# Altium PCB ZYNQ_BOARD.PcbDoc (part 4 of 9)
Units mm, origin at the board's own origin, x right, y up, seen from the top; angles counter-clockwise.
Board outline 120 x 66 mm, 10 copper layers (Top Layer, Internal Plane 1 (GND), Middle Layer 1, Middle Layer 2, Internal Plane 2 (+1.0V), Middle Layer 3, Middle Layer 4, Middle Layer 5 (PWR), Internal Plane 3 (GND), Bottom Layer), stack 0.982 mm thick; 333 components, 331 nets, 1511 pads, 1077 vias.
Unrouted connection lines stored in the file: 30.
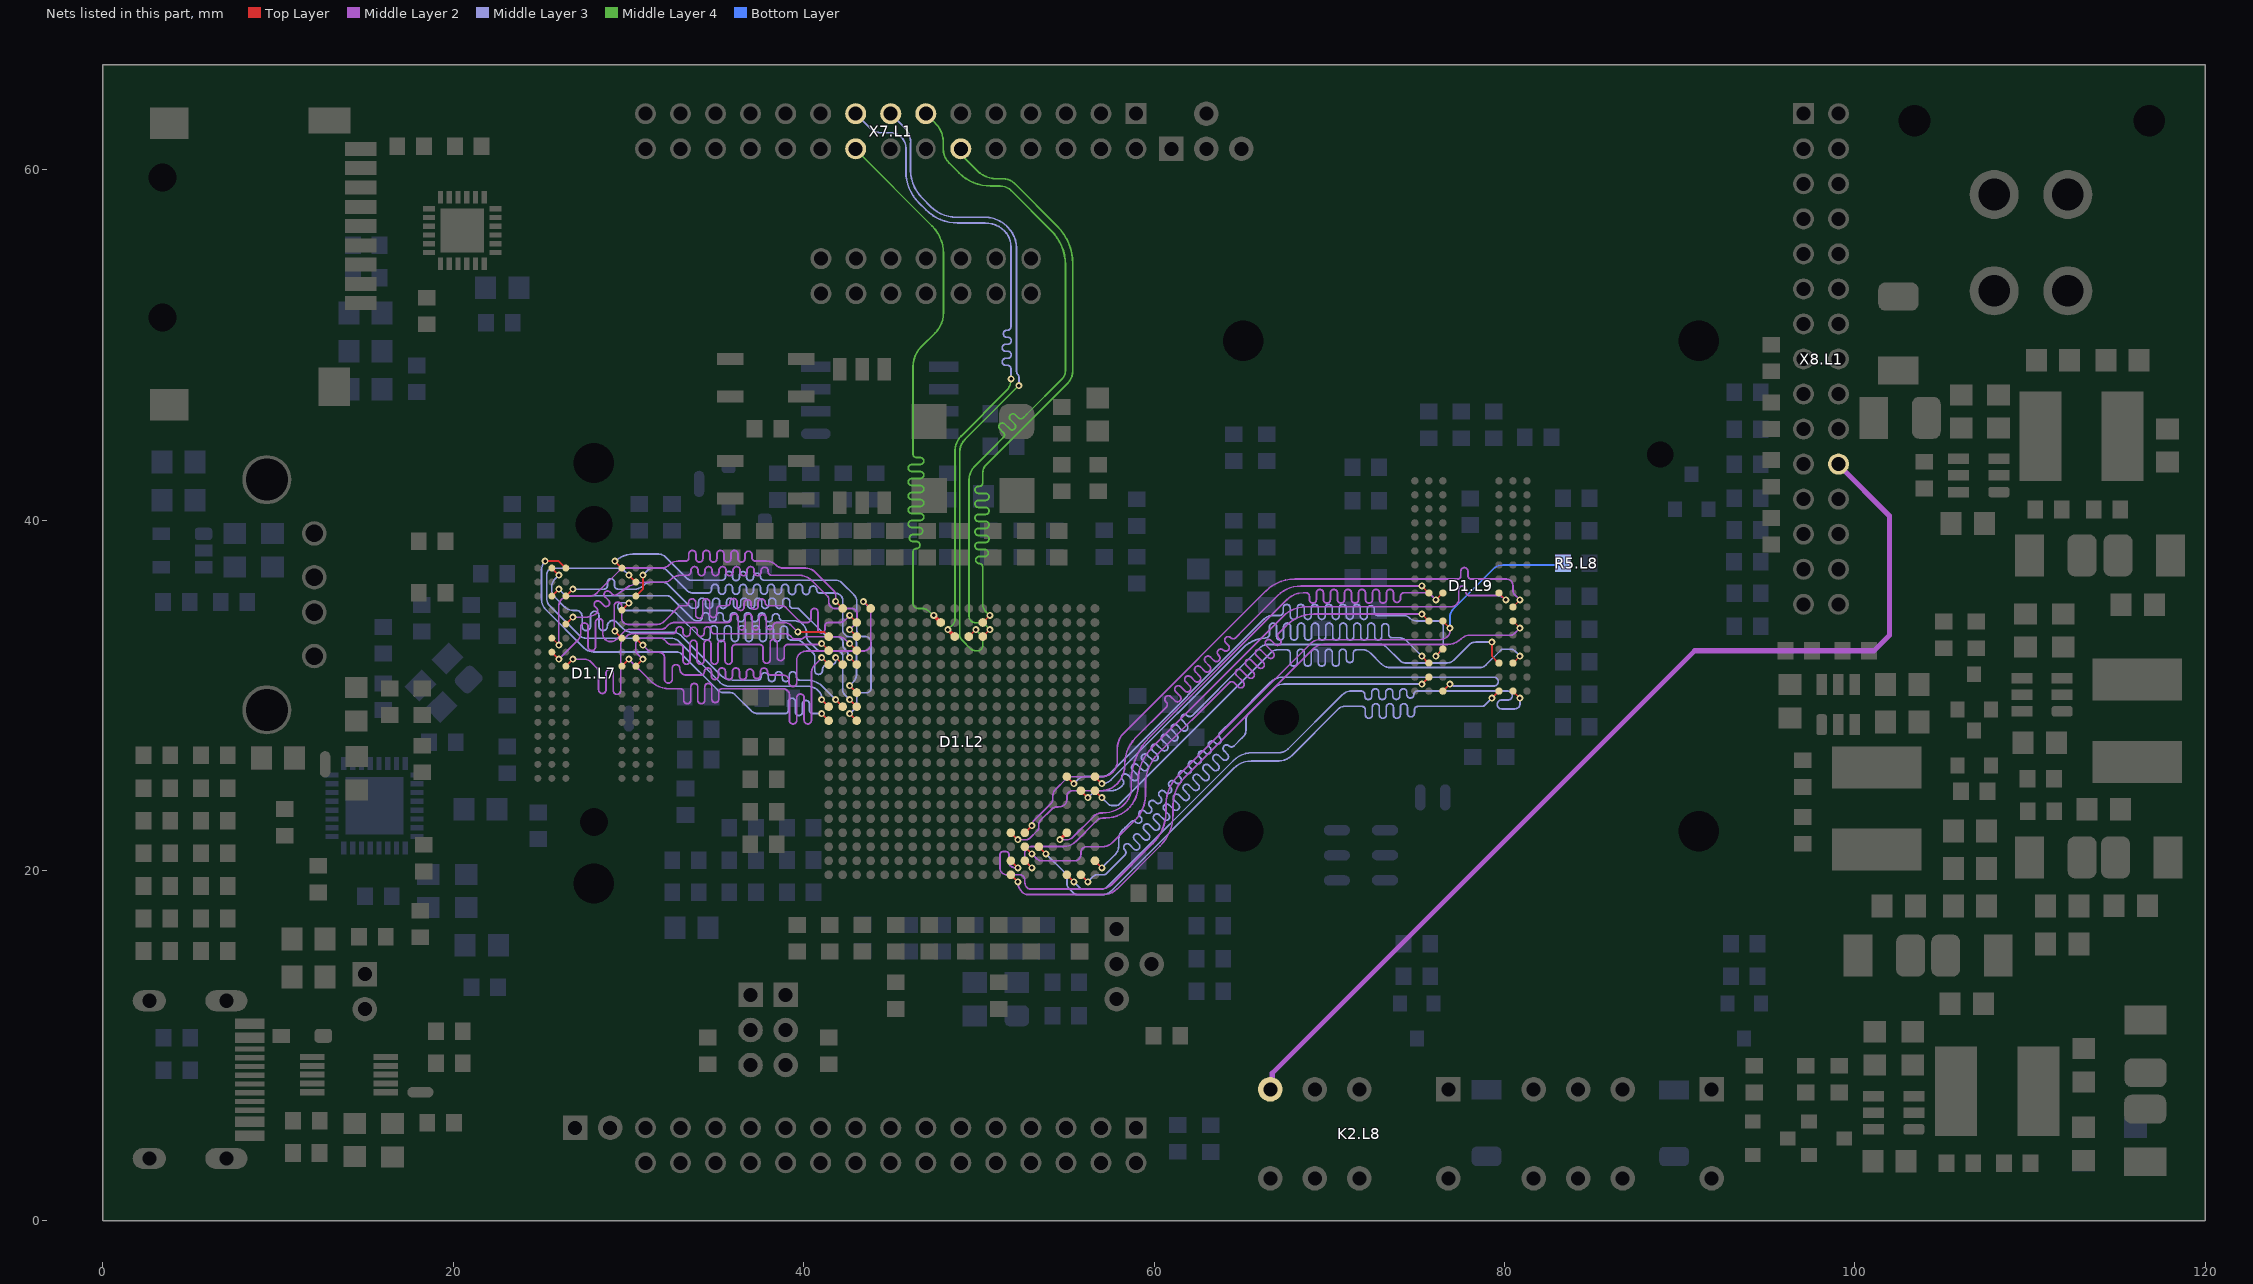
[diagram p12: the nets of this part, all layers, seen from the top]

## Via types
v1: diameter 0.4, hole 0.2, Top Layer to Bottom Layer, 1059 vias
v2: diameter 0.9, hole 0.6, Top Layer to Bottom Layer, 18 vias

## Nets (pads, with @x,y where several pads share a name; then routed paths per layer and width w, separated by ;. In a path a pad name is that pad's centre, name@x,y a point inside that pad or via, vN(x,y) a via of type N, cw(c..) or ccw(c..) an arc to the next point about the centre after c; other vN are vias at no path point) (continued)
DQ1: D1.L2.W14 D1.L9.F7 R5.L8.2 | length 46.1
  Top Layer w0.1: D1.L2.W14@51.82,20.56 v1(52.22,20.16) ; D1.L9.F7@76.48,34.245 v1(76.88,33.845)
  Middle Layer 2 w0.1: 51.201,20.145 ccw(c51.584,20.145) 51.581,19.762 ; 51.201,20.146 51.201,20.914 cw(c51.37,20.914) 51.37,21.083 51.546,21.083 cw(c51.546,20.914) 51.715,20.914 51.715,20.48 ccw(c52.001,20.48) 51.799,20.278 51.8,20.277 ccw(c52.085,20.562) 52.085,20.159 v1@52.219,20.159 ; 51.582,19.762 52.336,19.762 cw(c52.336,19.494) 52.526,19.684 cw(c52.298,19.456) 52.62,19.456 52.62,19.319 ccw(c53.043,19.319) 52.744,19.02 ccw(c52.913,19.189) 52.913,18.95 56.976,18.95 ccw(c56.976,19.804) 57.58,19.2 59.93,21.55 ccw(c58.134,23.346) 60.674,23.346 60.674,23.78 cw(c62.912,23.78) 61.329,25.362 68.932,32.965 cw(c69.453,32.443) 69.453,33.181 76.261,33.181 ccw(c76.261,33.929) 76.79,33.4 ccw(c76.573,33.617) 76.88,33.617 v1(76.88,33.845)
  Bottom Layer w0.1: v1(76.88,33.845) 76.88,34.465 cw(c77.539,34.465) 77.073,34.931 79.368,37.226 cw(c79.892,36.702) 79.892,37.443 83.101,37.443 ccw(c83.101,37.774) R5.L8.2@83.335,37.54
DQ1_M0_F: K2.L8.5 X8.L1.22 | length 57.5
  Middle Layer 2 w0.3: K2.L8.5@66.63,7.51 66.738,7.618 66.738,8.428 90.854,32.544 101.084,32.544 101.972,33.432 101.972,40.248 X8.L1.22@99.06,43.161
DQ2: D1.L2.Y14 D1.L9.F2 | length 37.6
  Top Layer w0.1: D1.L2.Y14@51.82,19.76 v1(52.22,19.36) ; D1.L9.F2@80.48,34.245 v1(80.88,33.845)
  Middle Layer 2 w0.1: v1(52.22,19.36) ccw(c53.041,19.36) 52.46,18.78 52.49,18.75 ccw(c52.78,19.04) 52.78,18.63 57.113,18.63 ccw(c57.113,19.723) 57.885,18.95 60.336,21.401 ccw(c58.54,23.197) 61.08,23.197 61.08,23.738 cw(c63.29,23.738) 61.727,25.3 69.083,32.656 cw(c69.687,32.054) 69.687,32.907 76.753,32.907 ccw(c76.753,33.982) 77.513,33.222 cw(c78.036,32.699) 78.036,33.438 80.368,33.438 ccw(c80.368,33.691) 80.547,33.512 v1(80.88,33.845)
DQ3: D1.L2.V15 D1.L9.F8 | length 37.6
  Top Layer w0.1: D1.L2.V15@52.62,21.36 v1(53.02,20.96) ; v1(75.28,34.645) D1.L9.F8@75.68,34.245
  Middle Layer 2 w0.1: v1(53.02,20.96) 53.335,20.645 ccw(c53.55,20.86) 53.55,20.556 55.459,20.556 ccw(c55.459,20.919) 55.715,20.662 ccw(c55.464,20.914) 55.819,20.914 55.819,21.05 cw(c56.113,21.05) 55.905,21.257 55.926,21.278 cw(c56.127,21.078) 56.127,21.361 57.025,21.361 ccw(c57.025,22.238) 57.645,21.618 58.908,22.882 ccw(c57.483,24.309) 59.5,24.309 ; 59.5,24.31 59.5,24.888 cw(c62.04,24.888) 60.244,26.684 63.962,30.402 64.281,30.721 cw(c64.422,30.579) 64.563,30.721 64.796,30.488 ccw(c64.938,30.629) 65.079,30.488 ccw(c64.938,30.629) 65.079,30.77 64.699,31.151 cw(c64.84,31.292) 64.699,31.434 cw(c64.84,31.292) 64.982,31.434 65.382,31.033 ccw(c65.523,31.175) 65.665,31.033 ccw(c65.523,31.175) 65.665,31.316 65.264,31.716 cw(c65.406,31.858) 65.264,31.999 cw(c65.406,31.858) 65.547,31.999 65.947,31.599 ccw(c66.089,31.741) 66.23,31.599 ccw(c66.089,31.741) 66.23,31.882 65.83,32.282 cw(c65.972,32.424) 65.83,32.565 cw(c65.972,32.424) 66.113,32.565 66.513,32.165 ccw(c66.655,32.306) 66.796,32.165 ccw(c66.655,32.306) 66.796,32.448 66.396,32.848 cw(c66.537,32.989) 66.396,33.131 cw(c66.537,32.989) 66.679,33.131 66.898,32.911 ccw(c67.04,33.052) 67.181,32.911 ccw(c67.04,33.052) 67.181,33.194 67.109,33.266 cw(c67.25,33.408) 67.109,33.549 67.56,34 67.915,34.288 cw(c69.117,32.443) 67.958,34.315 cw(c69.117,32.443) 69.117,34.645 v1(75.28,34.645)
DQ4: D1.L2.W15 D1.L9.H3 | length 37.6
  Top Layer w0.1: D1.L2.W15@52.62,20.56 v1(53.02,20.16) ; D1.L9.H3@79.68,35.845 v1(80.08,35.445)
  Middle Layer 2 w0.1: v1(53.02,20.16) 52.744,20.436 cw(c53.061,20.753) 52.613,20.753 52.613,20.984 cw(c52.98,20.984) 52.72,21.243 cw(c53.044,20.92) 53.044,21.377 54.846,21.377 ccw(c54.846,22.325) 55.516,21.655 56.707,22.846 cw(c57.08,22.473) 57.08,23 57.228,23 ; 57.229,23 ccw(c57.229,24.86) 59.088,24.86 59.088,25.1 cw(c61.839,25.1) 59.894,27.045 67.369,34.521 cw(c68.649,33.246) 68.649,35.053 76.92,35.053 ccw(c76.92,35.53) 77.257,35.192 77.265,35.2 ccw(c76.963,35.502) 77.39,35.502 77.39,36.042 cw(c77.59,36.042) 77.59,36.242 cw(c77.59,36.042) 77.789,36.042 77.789,35.919 ccw(c78.031,35.919) 77.86,35.748 ccw(c77.975,35.863) 77.975,35.7 79.464,35.7 cw(c79.464,34.829) v1(80.08,35.445)
DQ5: D1.L2.U14 D1.L9.H8 | length 37.6
  Top Layer w0.1: D1.L2.U14@51.82,22.16 v1(52.22,21.76) ; v1(75.28,36.245) D1.L9.H8@75.68,35.845
  Middle Layer 2 w0.1: v1(52.22,21.76) 52.671,21.76 ccw(c52.671,22.115) 52.922,21.864 53.344,22.286 ccw(c53.176,22.453) 53.413,22.453 53.413,22.618 cw(c53.764,22.618) 53.516,22.866 54.181,23.531 cw(c54.42,23.293) 54.42,23.63 54.531,23.63 ; 54.532,23.63 ccw(c54.532,24.166) 54.912,23.788 ccw(c54.642,24.056) 55.022,24.056 55.022,24.245 ; 55.022,24.246 cw(c55.332,24.246) 55.354,24.555 56.937,24.555 ; 56.937,24.555 ccw(c56.937,25.897) 57.885,24.947 ccw(c56.835,25.997) 58.32,25.997 ; 58.32,25.998 58.32,26.063 cw(c60.486,26.063) 58.954,27.594 60.658,29.298 60.693,29.333 ccw(c60.552,29.475) 60.693,29.616 60.669,29.64 cw(c60.811,29.782) 60.669,29.923 cw(c60.811,29.782) 60.952,29.923 61.187,29.688 ccw(c61.329,29.829) 61.47,29.688 ccw(c61.329,29.829) 61.47,29.971 61.235,30.206 cw(c61.377,30.347) 61.235,30.489 cw(c61.377,30.347) 61.518,30.489 61.753,30.254 ccw(c61.895,30.395) 62.036,30.254 ccw(c61.895,30.395) 62.036,30.536 61.801,30.772 cw(c61.942,30.913) 61.801,31.054 cw(c61.942,30.913) 62.084,31.054 62.319,30.819 ccw(c62.46,30.961) 62.602,30.819 ccw(c62.46,30.961) 62.602,31.102 62.367,31.337 cw(c62.508,31.479) 62.367,31.62 cw(c62.508,31.479) 62.649,31.62 62.884,31.385 ccw(c63.026,31.526) 63.167,31.385 ccw(c63.026,31.526) 63.167,31.668 62.932,31.903 cw(c63.074,32.044) 62.932,32.186 cw(c63.074,32.044) 63.215,32.186 63.414,31.987 ccw(c63.556,32.128) 63.697,31.987 ccw(c63.556,32.128) 63.697,32.269 63.663,32.303 cw(c63.805,32.445) 63.663,32.586 cw(c63.805,32.445) 63.946,32.586 ccw(c64.088,32.727) 64.229,32.586 ccw(c64.088,32.727) 64.229,32.869 64.087,33.01 cw(c64.229,33.152) 64.087,33.293 cw(c64.229,33.152) 64.37,33.293 ccw(c64.512,33.435) 64.653,33.293 65.101,33.741 67.06,35.7 cw(c68.376,34.384) 68.376,36.245 v1(75.28,36.245)
DQ6: D1.L2.U15 D1.L9.G2 | length 37.6
  Top Layer w0.1: D1.L2.U15@52.62,22.16 v1(53.02,22.56) ; D1.L9.G2@80.48,35.045 v1(80.88,35.445)
  Middle Layer 2 w0.1: v1(53.02,22.56) cw(c53.461,22.56) 53.149,22.872 54.131,23.854 ccw(c53.929,24.056) 54.215,24.056 54.215,24.259 cw(c54.726,24.259) 54.364,24.62 54.999,25.255 cw(c55.257,24.997) 55.257,25.362 57.024,25.362 ; 57.025,25.362 ccw(c57.025,26.217) 57.629,25.612 ccw(c56.973,26.267) 57.9,26.267 57.9,26.965 cw(c59.145,26.965) 58.265,27.845 58.714,28.294 66.376,35.956 cw(c68.02,34.311) 68.02,36.637 77.257,36.637 77.307,36.637 ccw(c77.307,36.837) 77.507,36.837 77.507,37.094 cw(c77.707,37.094) 77.907,37.094 77.907,36.837 ccw(c78.107,36.837) 78.107,36.637 78.99,36.637 80.132,36.637 cw(c80.132,36.305) 80.368,36.54 cw(c80.098,36.27) 80.479,36.27 80.479,35.984 ccw(c80.814,35.984) 80.577,35.748 v1(80.88,35.445)
DQ7: D1.L2.U18 D1.L9.H7 | length 37.6
  Top Layer w0.1: v1(76.08,35.445) D1.L9.H7@76.48,35.845
  Top Layer w0.2: v1(54.62,21.76) D1.L2.U18@55.02,22.16
  Middle Layer 2 w0.1: v1(54.62,21.76) 55.022,21.76 ccw(c55.022,22.235) 55.358,21.899 56.572,23.113 cw(c57,22.684) 57,23.29 57.065,23.29 ; 57.066,23.29 ccw(c57.066,25.075) 58.329,23.814 ccw(c57.418,24.716) 58.7,24.716 58.7,25.124 ; 58.7,25.125 cw(c62.194,25.125) 59.724,27.596 67.608,35.48 cw(c68.528,34.559) 68.212,35.822 cw(c68.528,34.559) 68.262,35.833 68.528,35.861 68.662,35.861 cw(c68.662,35.661) 68.862,35.661 68.862,35.467 ccw(c69.062,35.467) 69.262,35.467 69.262,35.845 cw(c69.462,35.845) 69.662,35.845 69.662,35.467 ccw(c69.862,35.467) 70.062,35.467 70.062,35.845 cw(c70.262,35.845) 70.462,35.845 70.462,35.467 ccw(c70.662,35.467) 70.862,35.467 70.862,35.845 cw(c71.062,35.845) 71.262,35.845 71.262,35.467 ccw(c71.462,35.467) 71.662,35.467 71.662,35.845 cw(c71.862,35.845) 72.062,35.845 72.062,35.467 ccw(c72.262,35.467) 72.462,35.467 72.462,35.845 cw(c72.662,35.845) 72.862,35.845 72.862,35.467 ccw(c73.062,35.467) 73.262,35.467 73.262,35.845 cw(c73.462,35.845) 73.662,35.845 73.662,35.507 ccw(c73.862,35.507) 74.062,35.507 74.062,35.661 cw(c74.262,35.661) 74.262,35.861 74.582,35.861 75.489,35.861 cw(c75.489,35.439) 75.788,35.737 v1(76.08,35.445)
DQ8: D1.L2.N18 D1.L9.D7 | length 37.2
  Top Layer w0.1: D1.L2.N18@55.02,25.36 v1(55.42,24.96) ; v1(76.08,32.245) D1.L9.D7@76.48,32.645
  Middle Layer 3 w0.1: v1(55.42,24.96) 55.678,25.218 cw(c56.03,24.865) 56.03,25.364 56.965,25.364 ccw(c56.965,26.148) 57.52,25.593 66.293,34.366 cw(c66.76,33.899) 66.76,34.56 67.117,34.56 67.167,34.56 ccw(c67.167,34.76) 67.367,34.76 67.367,34.993 cw(c67.567,34.993) 67.767,34.993 67.767,34.537 ccw(c67.967,34.537) 68.167,34.537 68.167,34.993 cw(c68.367,34.993) 68.567,34.993 68.567,34.537 ccw(c68.767,34.537) 68.967,34.537 68.967,34.993 cw(c69.167,34.993) 69.367,34.993 69.367,34.537 ccw(c69.567,34.537) 69.767,34.537 69.767,34.993 cw(c69.967,34.993) 70.167,34.993 70.167,34.537 ccw(c70.367,34.537) 70.567,34.537 70.567,34.993 cw(c70.767,34.993) 70.967,34.993 70.967,34.537 ccw(c71.167,34.537) 71.367,34.537 71.367,34.993 cw(c71.567,34.993) 71.767,34.993 71.767,34.537 ccw(c71.967,34.537) 72.167,34.537 72.167,34.922 cw(c72.367,34.922) 72.567,34.922 72.567,34.76 ccw(c72.767,34.76) 72.767,34.56 74.274,34.56 74.334,34.555 cw(c74.274,34.184) 74.384,34.544 cw(c74.274,34.184) 74.54,34.45 ccw(c75.038,34.948) 75.038,34.244 76.219,34.244 cw(c76.219,34.003) 76.39,34.173 cw(c76.124,33.907) 76.5,33.907 76.5,32.934 cw(c75.896,32.934) 76.323,32.507 76.093,32.277 ccw(c76.126,32.245) v1(76.08,32.245)
DQ9: D1.L2.P19 D1.L9.C3 | length 37.2
  Top Layer w0.1: D1.L2.P19@55.82,24.56 v1(56.22,24.16) ; v1(79.28,33.045) 79.28,32.245 D1.L9.C3@79.68,31.845
  Middle Layer 3 w0.1: v1(56.22,24.16) 56.514,24.454 cw(c56.77,24.198) 56.77,24.56 57.55,24.56 ccw(c57.55,25.36) 58.116,24.794 58.174,24.852 58.209,24.888 ccw(c58.068,25.029) 58.209,25.17 58.2,25.179 cw(c58.342,25.321) 58.2,25.462 cw(c58.342,25.321) 58.483,25.462 58.753,25.192 ccw(c58.895,25.333) 59.036,25.192 ccw(c58.895,25.333) 59.036,25.475 58.766,25.745 cw(c58.907,25.886) 58.766,26.028 cw(c58.907,25.886) 59.049,26.028 59.319,25.757 ccw(c59.46,25.899) 59.602,25.757 ccw(c59.46,25.899) 59.602,26.04 59.331,26.311 cw(c59.473,26.452) 59.331,26.594 cw(c59.473,26.452) 59.614,26.594 59.885,26.323 ccw(c60.026,26.465) 60.168,26.323 ccw(c60.026,26.465) 60.168,26.606 59.897,26.876 cw(c60.039,27.018) 59.897,27.159 cw(c60.039,27.018) 60.18,27.159 60.45,26.889 ccw(c60.592,27.03) 60.733,26.889 ccw(c60.592,27.03) 60.733,27.172 60.463,27.442 cw(c60.604,27.584) 60.463,27.725 cw(c60.604,27.584) 60.746,27.725 61.016,27.455 ccw(c61.158,27.596) 61.299,27.455 ccw(c61.158,27.596) 61.299,27.737 61.029,28.008 cw(c61.17,28.149) 61.029,28.291 cw(c61.17,28.149) 61.311,28.291 61.582,28.02 ccw(c61.723,28.162) 61.865,28.02 ccw(c61.723,28.162) 61.865,28.303 61.598,28.57 cw(c61.739,28.712) 61.598,28.853 cw(c61.739,28.712) 61.88,28.853 61.886,28.847 ccw(c62.027,28.989) 62.169,28.847 65.228,31.907 66.044,32.723 cw(c66.496,32.27) 66.496,32.91 72.91,32.91 cw(c72.91,32.45) 73.235,32.775 74.04,31.97 ccw(c74.325,32.255) 74.325,31.853 76.722,31.853 ccw(c76.722,32.385) 77.098,32.008 77.98,32.89 cw(c78.354,32.516) 78.354,33.045 v1(79.28,33.045)
DQ10: D1.L2.N20 D1.L9.C8 | length 37.2
  Top Layer w0.1: D1.L2.N20@56.62,25.36 v1(57.02,24.96) ; v1(75.28,32.245) D1.L9.C8@75.68,31.845
  Middle Layer 3 w0.1: v1(57.02,24.96) ccw(c57.02,25.691) 57.537,25.174 65.056,32.693 cw(c66.492,31.256) 66.338,33.282 cw(c66.492,31.256) 66.388,33.285 66.394,33.285 ccw(c66.388,33.485) 66.588,33.485 66.588,33.926 cw(c66.788,33.926) 66.988,33.926 66.988,33.355 ccw(c67.188,33.355) 67.388,33.355 67.388,33.926 cw(c67.588,33.926) 67.788,33.926 67.788,33.355 ccw(c67.988,33.355) 68.188,33.355 68.188,33.926 cw(c68.388,33.926) 68.588,33.926 68.588,33.355 ccw(c68.788,33.355) 68.988,33.355 68.988,33.926 cw(c69.188,33.926) 69.388,33.926 69.388,33.355 ccw(c69.588,33.355) 69.788,33.355 69.788,33.926 cw(c69.988,33.926) 70.188,33.926 70.188,33.355 ccw(c70.388,33.355) 70.588,33.355 70.588,33.926 cw(c70.788,33.926) 70.988,33.926 70.988,33.355 ccw(c71.188,33.355) 71.388,33.355 71.388,33.926 cw(c71.588,33.926) 71.788,33.926 71.788,33.355 ccw(c71.988,33.355) 72.188,33.355 72.188,33.926 cw(c72.388,33.926) 72.588,33.926 72.588,33.355 ccw(c72.788,33.355) 72.988,33.355 72.988,33.894 cw(c73.188,33.894) 73.388,33.894 73.388,33.488 ccw(c73.588,33.488) 73.588,33.288 73.98,33.288 74.051,33.284 cw(c73.98,32.668) 74.101,33.276 cw(c73.98,32.668) 74.405,33.119 cw(c73.98,32.668) 74.419,33.106 74.42,33.105 v1(75.28,32.245)
DQ11: D1.L2.P20 D1.L9.C2 | length 37.2
  Top Layer w0.1: D1.L2.P20@56.62,24.56 v1(57.02,24.16) ; D1.L9.C2@80.48,31.845 v1(80.88,32.245)
  Middle Layer 3 w0.1: v1(57.02,24.16) 57.396,23.784 ccw(c57.55,23.937) 57.55,23.72 57.866,23.72 ccw(c57.866,23.909) 58,23.775 66.667,32.442 cw(c67.047,32.063) 67.047,32.6 67.117,32.6 67.567,32.6 cw(c67.567,32.4) 67.767,32.4 67.767,31.87 ccw(c67.967,31.87) 68.167,31.87 68.167,32.436 cw(c68.367,32.436) 68.567,32.436 68.567,31.87 ccw(c68.767,31.87) 68.967,31.87 68.967,32.436 cw(c69.167,32.436) 69.367,32.436 69.367,31.87 ccw(c69.567,31.87) 69.767,31.87 69.767,32.436 cw(c69.967,32.436) 70.167,32.436 70.167,31.87 ccw(c70.367,31.87) 70.567,31.87 70.567,32.436 cw(c70.767,32.436) 70.967,32.436 70.967,32.075 ccw(c71.167,32.075) 71.367,32.075 71.367,32.4 cw(c71.567,32.4) 71.567,32.6 71.89,32.6 cw(c71.89,31.93) 71.933,32.599 cw(c71.89,31.93) 72.364,32.404 72.98,31.787 ccw(c73.467,32.274) 73.467,31.586 78.57,31.586 ccw(c78.57,32.113) 78.943,31.74 79.767,32.564 cw(c79.95,32.381) 79.95,32.64 80.358,32.64 cw(c80.358,32.333) 80.575,32.55 80.576,32.549 v1(80.88,32.245)
DQ12: D1.L2.W20 D1.L9.A7 | length 37.2
  Top Layer w0.1: D1.L2.W20@56.62,20.56 v1(57.02,20.16) ; D1.L9.A7@76.48,30.245 v1(76.88,30.645)
  Middle Layer 3 w0.1: v1(57.02,20.16) 57.768,20.908 ccw(c57.256,21.42) 57.98,21.42 57.98,21.804 ; 57.98,21.805 cw(c58.677,21.805) 58.185,22.298 58.342,22.456 58.66,22.774 cw(c58.802,22.632) 58.943,22.774 58.956,22.761 ccw(c59.098,22.902) 59.239,22.761 ccw(c59.098,22.902) 59.239,23.043 59.186,23.097 cw(c59.327,23.238) 59.186,23.38 cw(c59.327,23.238) 59.469,23.38 59.522,23.326 ccw(c59.664,23.468) 59.805,23.326 ccw(c59.664,23.468) 59.805,23.609 59.752,23.663 cw(c59.893,23.804) 59.752,23.945 cw(c59.893,23.804) 60.034,23.945 60.088,23.892 ccw(c60.229,24.033) 60.371,23.892 ccw(c60.229,24.033) 60.371,24.175 60.317,24.228 cw(c60.459,24.37) 60.317,24.511 cw(c60.459,24.37) 60.6,24.511 60.654,24.458 ccw(c60.795,24.599) 60.936,24.458 ccw(c60.795,24.599) 60.936,24.741 60.883,24.794 cw(c61.024,24.935) 60.883,25.077 cw(c61.024,24.935) 61.166,25.077 61.219,25.023 ccw(c61.361,25.165) 61.502,25.023 ccw(c61.361,25.165) 61.502,25.306 61.449,25.36 cw(c61.59,25.501) 61.449,25.642 cw(c61.59,25.501) 61.731,25.642 61.785,25.589 ccw(c61.926,25.73) 62.068,25.589 ccw(c61.926,25.73) 62.068,25.872 62.014,25.925 cw(c62.156,26.067) 62.014,26.208 cw(c62.156,26.067) 62.297,26.208 62.351,26.155 ccw(c62.492,26.296) 62.633,26.155 ccw(c62.492,26.296) 62.633,26.438 62.58,26.491 cw(c62.721,26.632) 62.58,26.774 cw(c62.721,26.632) 62.863,26.774 62.916,26.72 ccw(c63.058,26.862) 63.199,26.72 ccw(c63.058,26.862) 63.199,27.003 63.146,27.057 cw(c63.287,27.198) 63.146,27.34 cw(c63.287,27.198) 63.428,27.34 63.482,27.286 ccw(c63.623,27.428) 63.765,27.286 ccw(c63.623,27.428) 63.765,27.569 63.752,27.582 cw(c63.893,27.724) 63.752,27.865 64.508,28.622 66.633,30.746 cw(c67.347,30.032) 67.347,31.042 79.39,31.042 cw(c79.39,30.788) 79.644,30.788 cw(c79.39,30.788) 79.39,30.534 77.149,30.534 cw(c77.149,30.914) v1(76.88,30.645)
DQ13: D1.L2.Y18 D1.L9.A2 | length 37.2
  Top Layer w0.1: D1.L2.Y18@55.02,19.76 v1(55.42,19.36) ; D1.L9.A2@80.48,30.245 v1(80.88,29.845)
  Middle Layer 3 w0.1: v1(55.42,19.36) 55.781,18.999 ccw(c55.903,19.121) 55.903,18.949 57.024,18.949 ccw(c57.024,19.364) 57.318,19.07 64.531,26.284 cw(c65.604,25.21) 65.604,26.728 67.128,26.728 ccw(c67.128,27.452) 67.64,26.94 70.685,29.985 70.731,30.031 cw(c71.25,29.512) 71.121,30.235 cw(c71.25,29.512) 71.25,30.246 71.373,30.246 71.823,30.246 cw(c71.823,30.046) 72.023,30.046 72.023,29.96 ccw(c72.223,29.96) 72.423,29.96 72.423,30.175 cw(c72.623,30.175) 72.823,30.175 72.823,29.96 ccw(c73.023,29.96) 73.223,29.96 73.223,30.175 cw(c73.423,30.175) 73.623,30.175 73.623,29.97 ccw(c73.823,29.97) 74.023,29.97 74.023,30.175 cw(c74.223,30.175) 74.423,30.175 74.423,30.046 ccw(c74.623,30.046) 74.823,30.046 cw(c75.023,30.046) 75.023,30.246 75.541,30.246 80.192,30.246 cw(c80.192,29.992) 80.446,29.992 cw(c80.192,29.992) 80.192,29.738 79.835,29.738 ccw(c79.835,29.484) 79.581,29.484 ccw(c79.835,29.484) 79.835,29.229 80.576,29.229 ccw(c80.576,29.552) 80.804,29.324 80.81,29.33 ccw(c80.641,29.499) 80.88,29.499 v1(80.88,29.845)
DQ14: D1.L2.Y19 D1.L9.B8 | length 37.2
  Top Layer w0.1: D1.L2.Y19@55.82,19.76 v1(56.22,19.36) ; v1(75.28,30.645) D1.L9.B8@75.68,31.045
  Middle Layer 3 w0.1: v1(56.22,19.36) 56.528,19.668 cw(c56.75,19.446) 56.75,19.76 57.117,19.76 ccw(c57.117,19.968) 57.264,19.821 58.3,20.856 58.335,20.892 ccw(c58.193,21.033) 58.335,21.174 58.321,21.188 cw(c58.463,21.329) 58.321,21.471 cw(c58.463,21.329) 58.604,21.471 58.842,21.233 ccw(c58.984,21.374) 59.125,21.233 ccw(c58.984,21.374) 59.125,21.516 58.88,21.76 cw(c59.022,21.902) 58.88,22.043 cw(c59.022,21.902) 59.163,22.043 59.408,21.799 ccw(c59.549,21.94) 59.691,21.799 ccw(c59.549,21.94) 59.691,22.081 59.446,22.326 cw(c59.588,22.467) 59.446,22.609 cw(c59.588,22.467) 59.729,22.609 59.974,22.364 ccw(c60.115,22.506) 60.256,22.364 ccw(c60.115,22.506) 60.256,22.647 60.012,22.892 cw(c60.153,23.033) 60.012,23.174 cw(c60.153,23.033) 60.295,23.174 60.539,22.93 ccw(c60.681,23.071) 60.822,22.93 ccw(c60.681,23.071) 60.822,23.213 60.577,23.457 cw(c60.719,23.599) 60.577,23.74 cw(c60.719,23.599) 60.86,23.74 61.105,23.496 ccw(c61.246,23.637) 61.388,23.496 ccw(c61.246,23.637) 61.388,23.778 61.143,24.023 cw(c61.285,24.164) 61.143,24.306 cw(c61.285,24.164) 61.426,24.306 61.671,24.061 ccw(c61.812,24.203) 61.953,24.061 ccw(c61.812,24.203) 61.953,24.344 61.709,24.589 cw(c61.85,24.73) 61.709,24.872 cw(c61.85,24.73) 61.992,24.872 62.236,24.627 ccw(c62.378,24.768) 62.519,24.627 ccw(c62.378,24.768) 62.519,24.91 62.275,25.154 cw(c62.416,25.296) 62.275,25.437 cw(c62.416,25.296) 62.557,25.437 62.802,25.193 ccw(c62.943,25.334) 63.085,25.193 ccw(c62.943,25.334) 63.085,25.475 62.84,25.72 cw(c62.982,25.861) 62.84,26.003 cw(c62.982,25.861) 63.123,26.003 63.368,25.758 ccw(c63.509,25.9) 63.65,25.758 ccw(c63.509,25.9) 63.65,26.041 63.406,26.286 cw(c63.547,26.427) 63.406,26.569 cw(c63.547,26.427) 63.689,26.569 63.902,26.355 ccw(c64.044,26.497) 64.185,26.355 ccw(c64.044,26.497) 64.185,26.638 63.992,26.831 cw(c64.133,26.973) 63.992,27.114 cw(c64.133,26.973) 64.275,27.114 ccw(c64.416,27.256) 64.557,27.114 65.009,27.566 65.093,27.65 ccw(c64.739,28.004) 65.24,28.004 65.24,28.591 cw(c65.752,28.591) 65.39,28.953 66.849,30.412 cw(c67.412,29.848) 67.412,30.645 v1(75.28,30.645)
DQ15: D1.L2.V16 D1.L9.A3 | length 37.2
  Top Layer w0.1: D1.L2.V16@53.42,21.36 v1(53.82,20.96) ; v1(79.28,29.845) D1.L9.A3@79.68,30.245
  Middle Layer 3 w0.1: v1(53.82,20.96) 54.908,19.872 cw(c54.624,19.587) 55.026,19.587 55.026,19.229 ; 55.026,19.228 ccw(c55.363,19.228) 55.125,18.99 ; 55.126,18.989 55.388,18.727 55.389,18.726 ccw(c55.644,18.981) 55.644,18.62 ; 55.646,18.62 57.058,18.62 ccw(c57.058,19.265) 57.514,18.809 64.55,25.846 cw(c65.547,24.85) 65.547,26.259 67.123,26.259 ccw(c67.123,27.287) 67.85,26.56 70.52,29.23 cw(c70.865,28.885) 70.865,29.373 71.405,29.373 71.855,29.373 cw(c71.855,29.173) 72.055,29.173 72.055,28.895 ccw(c72.255,28.895) 72.455,28.895 72.455,29.325 cw(c72.655,29.325) 72.855,29.325 72.855,28.895 ccw(c73.055,28.895) 73.255,28.895 73.255,29.325 cw(c73.455,29.325) 73.655,29.325 73.655,28.895 ccw(c73.855,28.895) 74.055,28.895 74.055,29.325 cw(c74.255,29.325) 74.455,29.325 74.455,28.975 ccw(c74.655,28.975) 74.855,28.975 74.855,29.173 cw(c75.055,29.173) 75.055,29.373 76.383,29.373 78.713,29.373 ccw(c78.713,29.602) 78.875,29.44 v1(79.28,29.845)
DQ_M0: D1.L2.C3 D1.L7.E3 | length 26.1
  Top Layer w0.1: D1.L7.E3@26.42,34.065 v1(26.82,34.465) ; v1(42.62,33.76) D1.L2.C3@43.02,33.36
  Middle Layer 2 w0.1: v1(26.82,34.465) 27.481,34.465 ccw(c27.481,35.779) 28.055,34.597 ccw(c27.481,35.779) 28.102,34.621 28.159,34.664 ccw(c28.04,34.824) 28.181,34.966 28.096,35.052 cw(c28.237,35.193) 28.096,35.334 cw(c28.237,35.193) 28.378,35.334 28.579,35.134 ccw(c28.72,35.275) 28.862,35.134 ccw(c28.72,35.275) 28.862,35.417 28.661,35.617 cw(c28.803,35.759) 28.661,35.9 cw(c28.803,35.759) 28.944,35.9 29.071,35.773 ccw(c29.212,35.915) 29.325,35.75 30.045,36.243 cw(c31.072,33.92) 30.095,36.264 cw(c31.072,33.92) 31.072,36.46 32.022,36.46 ccw(c32.022,37.023) 32.42,36.625 cw(c32.978,36.067) 32.978,36.856 33.314,36.856 33.364,36.856 ccw(c33.364,37.056) 33.564,37.056 33.564,37.151 cw(c33.764,37.151) 33.964,37.151 33.964,37.035 ccw(c34.164,37.035) 34.364,37.035 34.364,37.151 cw(c34.564,37.151) 34.764,37.151 34.764,37.035 ccw(c34.964,37.035) 35.164,37.035 35.164,37.151 cw(c35.364,37.151) 35.564,37.151 35.564,37.035 ccw(c35.764,37.035) 35.964,37.035 35.964,37.151 cw(c36.164,37.151) 36.364,37.151 36.364,37.035 ccw(c36.564,37.035) 36.764,37.035 36.764,37.151 cw(c36.964,37.151) 37.164,37.151 37.164,37.035 ccw(c37.364,37.035) 37.564,37.035 37.564,37.121 cw(c37.764,37.121) 37.964,37.121 37.964,37.056 ccw(c38.164,37.056) 38.164,36.856 38.589,36.856 39.734,36.856 cw(c39.734,35.827) 40.461,36.555 41.357,35.659 cw(c41.173,35.476) 41.433,35.476 41.433,35.293 ccw(c41.766,35.293) 41.53,35.058 ccw(c41.765,35.292) 41.765,34.96 ; 41.766,34.96 42.737,34.96 ; v1(42.62,33.76) 42.922,34.062 ccw(c42.638,34.345) 43.039,34.345 43.039,34.652 ccw(c42.726,34.652) 42.948,34.872 ccw(c42.738,34.664) 42.738,34.96
DQ_M1: D1.L2.B3 D1.L7.F7 | length 26.1
  Top Layer w0.1: v1(29.22,33.665) D1.L7.F7@29.62,33.265 ; v1(42.62,34.56) D1.L2.B3@43.02,34.16
  Middle Layer 2 w0.1: v1(29.22,33.665) cw(c29.301,33.746) 29.186,33.746 29.186,35.115 cw(c29.396,35.115) 29.396,35.325 cw(c29.396,35.115) 29.606,35.115 29.606,34.404 ccw(c29.96,34.404) 29.71,34.154 ccw(c29.956,34.4) 29.956,34.052 31.622,34.052 ccw(c31.622,34.628) 32.03,34.22 32.863,35.053 cw(c33,34.917) 33,35.11 33.18,35.11 33.23,35.11 ccw(c33.23,35.31) 33.43,35.31 33.43,35.312 cw(c33.63,35.312) 33.83,35.312 33.83,34.6 ccw(c34.03,34.6) 34.23,34.6 34.23,35.312 cw(c34.43,35.312) 34.63,35.312 34.63,34.65 ccw(c34.83,34.65) 35.03,34.65 35.03,34.91 cw(c35.23,34.91) 35.23,35.11 35.54,35.11 35.545,35.11 35.595,35.11 ccw(c35.595,35.31) 35.795,35.31 35.795,35.328 cw(c35.995,35.328) 36.195,35.328 36.195,35.048 ccw(c36.395,35.048) 36.595,35.048 36.595,35.262 cw(c36.795,35.262) 36.995,35.262 36.995,35.11 ccw(c37.195,35.11) 37.395,35.11 37.395,35.31 cw(c37.595,35.31) 37.795,35.31 ccw(c37.995,35.31) 37.995,35.11 38.319,35.11 38.756,35.11 cw(c38.756,34.791) 38.767,35.11 cw(c38.756,34.791) 38.982,35.017 38.983,35.016 39.725,34.274 ; v1(42.62,34.56) 42.365,34.305 cw(c42.015,34.655) 42.015,34.16 41.458,34.16 41.408,34.16 ccw(c41.408,33.96) 41.208,33.96 41.208,33.764 cw(c41.008,33.764) 40.808,33.764 40.808,34.765 ccw(c40.608,34.765) 40.408,34.765 40.408,34.36 cw(c40.208,34.36) 40.208,34.16 39.998,34.16 39.992,34.16 cw(c39.998,34.546) 39.942,34.164 cw(c39.998,34.546) 39.726,34.273 ; 39.725,34.274 39.726,34.273
DQ_M2: D1.L2.A2 D1.L7.F2 | length 26.1
  Top Layer w0.1: D1.L7.F2@25.628,33.273 v1(26.028,32.873) ; v1(41.82,35.36) D1.L2.A2@42.22,34.96
  Middle Layer 2 w0.1: v1@26.02,32.873 26.02,35.114 cw(c26.532,35.114) 26.17,35.476 cw(c26.639,35.007) 26.639,35.67 27.768,35.67 ; 27.769,35.67 ccw(c27.769,36.28) 28.201,35.849 29.48,37.128 cw(c29.819,36.79) 29.819,37.269 31.886,37.269 ccw(c31.886,37.854) 32.3,37.44 cw(c32.843,36.897) 32.843,37.665 33.193,37.665 33.243,37.665 ccw(c33.243,37.865) 33.443,37.865 33.443,38.075 cw(c33.643,38.075) 33.843,38.075 33.843,37.808 ccw(c34.043,37.808) 34.243,37.808 34.243,38.075 cw(c34.443,38.075) 34.643,38.075 34.643,37.808 ccw(c34.843,37.808) 35.043,37.808 35.043,38.075 cw(c35.243,38.075) 35.443,38.075 35.443,37.808 ccw(c35.643,37.808) 35.843,37.808 35.843,38.075 cw(c36.043,38.075) 36.243,38.075 36.243,37.808 ccw(c36.443,37.808) 36.643,37.808 36.643,38.028 cw(c36.843,38.028) 37.043,38.028 37.043,37.865 ccw(c37.243,37.865) 37.243,37.665 37.863,37.665 38.031,37.647 cw(c37.863,36.863) 38.081,37.635 cw(c37.863,36.863) 38.43,37.43 ccw(c38.82,37.82) 38.82,37.269 40.117,37.269 cw(c40.117,36.543) 40.63,37.056 41.714,35.972 cw(c41.458,35.716) 41.82,35.716 v1(41.82,35.36)
DQ_M3: D1.L2.A4 D1.L7.F8 | length 26.1
  Top Layer w0.1: D1.L7.F8@30.42,33.265 v1(30.82,32.865) ; v1@43.415,35.358 D1.L2.A4@43.813,34.96
  Top Layer w0.2: v1(43.408,35.358) v1@43.415,35.358 ; D1.L2.A4@43.813,34.96 D1.L2.A4@43.82,34.96
  Middle Layer 2 w0.1: v1(30.82,32.865) 31.112,32.573 ccw(c31.393,32.853) 31.393,32.456 31.752,32.456 cw(c31.752,32.152) 31.966,32.368 cw(c31.763,32.163) 32.052,32.163 ; 32.052,32.162 32.052,30.92 ccw(c32.271,30.92) 32.271,30.701 ccw(c32.271,30.92) 32.49,30.92 32.49,31.534 cw(c32.709,31.534) 32.709,31.753 cw(c32.709,31.534) 32.928,31.534 32.928,31.506 ccw(c33.271,31.506) 33.028,31.264 ccw(c33.279,31.514) 33.279,31.16 34.078,31.16 34.128,31.16 ccw(c34.128,31.36) 34.328,31.36 34.328,31.365 cw(c34.528,31.365) 34.728,31.365 34.728,31.104 ccw(c34.928,31.104) 35.128,31.104 35.128,31.365 cw(c35.328,31.365) 35.528,31.365 35.528,31.104 ccw(c35.728,31.104) 35.928,31.104 35.928,31.365 cw(c36.128,31.365) 36.328,31.365 36.328,31.104 ccw(c36.528,31.104) 36.728,31.104 36.728,31.3 cw(c36.928,31.3) 37.128,31.3 37.128,31.16 ccw(c37.328,31.16) 37.528,31.16 37.528,31.36 cw(c37.728,31.36) 37.928,31.36 ccw(c38.128,31.36) 38.128,31.16 38.794,31.16 38.809,31.16 cw(c38.809,30.799) 38.818,31.16 cw(c38.809,30.799) 39.064,31.054 cw(c38.828,30.819) 39.162,30.819 39.162,30.721 ccw(c39.381,30.721) 39.381,30.501 ccw(c39.381,30.721) 39.6,30.721 39.6,32.019 cw(c40.08,32.019) 39.741,32.358 cw(c40.163,31.936) 40.163,32.533 43.4,32.533 ccw(c43.4,33) 43.73,32.67 ccw(c43.49,32.91) 43.829,32.91 43.829,34.67 ccw(c43.184,34.67) 43.64,35.127 43.4,35.367 v1@43.391,35.367
DQ_M4: D1.L2.D3 D1.L7.H3 | length 26.2
  Top Layer w0.1: D1.L7.H3@26.42,31.665 v1(26.82,32.065) ; v1(42.62,32.96) D1.L2.D3@43.02,32.56
  Top Layer w0.2: D1.L2.D3@43.006,32.56 D1.L2.D3@43.02,32.56
  Middle Layer 2 w0.1: v1(26.82,32.065) 27.488,32.065 cw(c27.488,31.57) 27.838,31.92 28.195,31.563 cw(c27.966,31.334) 28.29,31.334 28.29,30.316 ccw(c28.5,30.316) 28.5,30.106 ccw(c28.5,30.316) 28.71,30.316 28.71,31.276 cw(c28.92,31.276) 28.92,31.485 cw(c28.92,31.276) 29.13,31.276 29.13,30.272 ccw(c29.34,30.272) 29.34,30.062 ccw(c29.34,30.272) 29.55,30.272 29.55,32.909 cw(c29.844,32.909) 29.636,33.117 29.921,33.402 cw(c30.19,33.133) 30.19,33.513 32.464,33.513 32.514,33.513 ccw(c32.514,33.713) 32.714,33.713 ; 32.714,33.714 cw(c32.914,33.714) 33.114,33.714 33.114,33.566 ccw(c33.314,33.566) 33.514,33.566 33.514,33.686 cw(c33.714,33.686) 33.914,33.686 33.914,33.566 ccw(c34.114,33.566) 34.314,33.566 34.314,33.713 cw(c34.514,33.713) 34.714,33.713 ccw(c34.914,33.713) 34.914,33.513 35.995,33.513 38.95,33.513 cw(c38.95,33.133) 39.219,33.402 39.359,33.262 ccw(c39.481,33.383) 39.481,33.211 39.814,33.211 ccw(c39.814,33.446) 39.98,33.28 cw(c40.136,33.124) 40.136,33.345 42.003,33.345 cw(c42.003,32.849) 42.353,33.2 v1@42.651,32.902
DQ_M5: D1.L2.D1 D1.L7.H8 | length 26.1
  Top Layer w0.1: D1.L7.H8@30.42,31.665 v1(30.82,32.065) ; v1(41.02,32.96) D1.L2.D1@41.42,32.56
  Top Layer w0.2: D1.L2.D1@41.391,32.56 D1.L2.D1@41.42,32.56
  Middle Layer 2 w0.1: v1(30.82,32.065) 30.47,32.416 cw(c30.614,32.56) 30.41,32.56 30.41,32.909 cw(c30.776,32.909) 30.517,33.167 30.53,33.18 cw(c30.728,32.982) 30.728,33.262 31.856,33.262 cw(c31.856,33.016) 32.03,33.19 32.247,32.973 ccw(c32.42,33.147) 32.42,32.902 32.458,32.902 32.908,32.902 cw(c32.908,32.702) 33.108,32.702 33.108,31.98 ccw(c33.308,31.98) 33.508,31.98 33.508,32.948 cw(c33.708,32.948) 33.908,32.948 33.908,31.98 ccw(c34.108,31.98) 34.308,31.98 34.308,32.948 cw(c34.508,32.948) 34.708,32.948 34.708,31.98 ccw(c34.908,31.98) 35.108,31.98 35.108,32.948 cw(c35.308,32.948) 35.508,32.948 35.508,31.98 ccw(c35.708,31.98) 35.908,31.98 35.908,32.702 cw(c36.108,32.702) 36.108,32.902 37.003,32.902 37.031,32.902 37.481,32.902 cw(c37.481,32.702) 37.681,32.702 37.681,32.034 ccw(c37.881,32.034) 38.081,32.034 38.081,33.001 cw(c38.281,33.001) 38.481,33.001 38.481,32.183 ccw(c38.681,32.183) 38.881,32.183 38.881,32.702 cw(c39.081,32.702) 39.081,32.902 39.585,32.902 v1@41.02,32.902
DQ_M6: D1.L2.C1 D1.L7.G2 | length 26.1
  Top Layer w0.1: D1.L7.G2@25.62,32.465 v1(26.02,32.065) ; v1(39.66,33.62) 41.16,33.62 D1.L2.C1@41.42,33.36
  Middle Layer 2 w0.1: v1(26.02,32.065) 27.103,33.148 ccw(c26.7,33.551) 27.27,33.551 27.27,33.925 cw(c27.48,33.925) 27.48,34.135 cw(c27.48,33.925) 27.69,33.925 27.69,32.768 ccw(c27.9,32.768) 27.9,32.558 ccw(c27.9,32.768) 28.11,32.768 28.11,34.174 cw(c28.32,34.174) 28.32,34.384 cw(c28.32,34.174) 28.53,34.174 28.53,33.5 ccw(c28.94,33.5) 28.65,33.21 28.677,33.183 ccw(c28.95,33.456) 28.95,33.07 28.98,33.07 ccw(c28.98,33.553) 29.321,33.211 29.758,33.648 cw(c30.053,33.352) 30.053,33.77 31.85,33.77 ccw(c31.85,34.18) 32.14,33.89 32.247,33.997 cw(c32.64,33.605) 32.64,34.16 35.606,34.16 35.656,34.16 ccw(c35.656,34.36) 35.856,34.36 35.856,34.452 cw(c36.056,34.452) 36.256,34.452 36.256,33.934 ccw(c36.456,33.934) 36.656,33.934 36.656,34.452 cw(c36.856,34.452) 37.056,34.452 37.056,33.934 ccw(c37.256,33.934) 37.456,33.934 37.456,34.401 cw(c37.656,34.401) 37.856,34.401 37.856,33.96 ccw(c38.056,33.96) 38.256,33.96 cw(c38.456,33.96) 38.456,34.16 38.776,34.16 38.882,34.16 cw(c38.882,33.586) 39.009,34.146 cw(c38.882,33.586) 39.288,33.992 39.289,33.991 v1(39.66,33.62)
DQ_M7: D1.L2.E1 D1.L7.H7 | length 26.1
  Top Layer w0.1: D1.L7.H7@29.62,31.665 v1(30.02,32.065) ; v1(41.02,32.16) D1.L2.E1@41.42,31.76
  Middle Layer 2 w0.1: v1(30.02,32.065) 31.263,30.822 ccw(c32.33,31.889) 32.33,30.38 32.5,30.38 32.95,30.38 cw(c32.95,30.18) 33.15,30.18 33.15,29.726 ccw(c33.35,29.726) 33.55,29.726 33.55,30.483 cw(c33.75,30.483) 33.95,30.483 33.95,29.726 ccw(c34.15,29.726) 34.35,29.726 34.35,30.483 cw(c34.55,30.483) 34.75,30.483 34.75,29.789 ccw(c34.95,29.789) 35.15,29.789 35.15,30.18 cw(c35.35,30.18) 35.35,30.38 35.767,30.38 38.805,30.38 cw(c38.805,30.013) 39.064,30.272 39.108,30.229 cw(c38.934,30.055) 39.18,30.055 39.18,28.58 ccw(c39.39,28.58) 39.39,28.37 ccw(c39.39,28.58) 39.6,28.58 39.6,29.87 cw(c39.81,29.87) 39.81,30.08 cw(c39.81,29.87) 40.02,29.87 40.02,28.58 ccw(c40.23,28.58) 40.23,28.37 ccw(c40.23,28.58) 40.44,28.58 40.44,31.272 cw(c41.121,31.272) 40.639,31.754 41.02,32.134 v1(41.02,32.16)
DQ_M8: D1.L2.E2 D1.L7.D7 | length 25.7
  Top Layer w0.1: D1.L7.D7@29.62,34.865 v1(30.02,35.265) ; v1(41.82,32.16) D1.L2.E2@42.22,31.76
  Middle Layer 3 w0.1: v1(30.02,35.265) ccw(c29.96,35.205) 29.96,35.29 29.6,35.29 ccw(c29.6,35.07) 29.38,35.07 ccw(c29.6,35.07) 29.6,34.85 32.308,34.85 cw(c32.308,34.241) 32.738,34.672 32.74,34.67 34.106,33.304 34.107,33.303 ccw(c34.452,33.648) 34.223,33.217 ccw(c34.452,33.648) 34.418,33.161 ccw(c34.452,33.648) 34.452,33.16 ; 34.453,33.16 34.468,33.16 ccw(c34.468,33.36) 34.668,33.36 34.668,33.781 cw(c34.868,33.781) 35.068,33.781 35.068,33.276 ccw(c35.268,33.276) 35.468,33.276 35.468,33.781 cw(c35.668,33.781) 35.868,33.781 35.868,33.276 ccw(c36.068,33.276) 36.268,33.276 36.268,33.781 cw(c36.468,33.781) 36.668,33.781 36.668,33.276 ccw(c36.868,33.276) 37.068,33.276 37.068,33.781 cw(c37.268,33.781) 37.468,33.781 37.468,33.276 ccw(c37.668,33.276) 37.868,33.276 37.868,33.781 cw(c38.068,33.781) 38.268,33.781 38.268,33.276 ccw(c38.468,33.276) 38.668,33.276 38.668,33.759 cw(c38.868,33.759) 39.068,33.759 39.068,33.36 ccw(c39.268,33.36) 39.268,33.16 39.595,33.16 cw(c39.595,32.664) 39.608,33.16 cw(c39.595,32.664) 39.819,33.107 cw(c39.595,32.664) 39.946,33.015 40.517,32.444 cw(c40.252,32.18) 40.626,32.18 40.626,31.418 ccw(c40.846,31.418) 40.846,31.198 ccw(c40.846,31.418) 41.066,31.418 41.066,31.477 cw(c41.313,31.477) 41.138,31.651 cw(c41.377,31.413) 41.377,31.75 41.57,31.75 ccw(c41.57,32.043) 41.778,31.836 ccw(c41.675,31.938) 41.82,31.938 v1(41.82,32.16) v1@41.814,32.16
DQ_M9: D1.L2.E3 D1.L7.C3 | length 25.7
  Top Layer w0.1: D1.L7.C3@26.42,35.665 v1(26.82,36.065) ; v1(42.62,32.16) D1.L2.E3@43.02,31.76
  Middle Layer 3 w0.1: v1(26.82,36.065) 28.545,36.065 28.595,36.065 ccw(c28.595,36.265) 28.795,36.265 28.795,36.462 cw(c28.995,36.462) 29.195,36.462 29.195,36.265 ccw(c29.395,36.265) 29.395,36.065 30.349,36.065 30.362,36.065 ccw(c30.362,36.728) 30.83,36.259 cw(c31.302,35.787) 31.302,36.455 31.971,36.455 cw(c31.971,36.07) 32.244,36.342 33.552,35.034 ccw(c33.711,35.194) 33.711,34.968 33.747,34.968 33.797,34.968 ccw(c33.797,35.168) 33.997,35.168 33.997,35.351 cw(c34.197,35.351) 34.397,35.351 34.397,35.165 ccw(c34.597,35.165) 34.797,35.165 34.797,35.351 cw(c34.997,35.351) 35.197,35.351 35.197,35.165 ccw(c35.397,35.165) 35.597,35.165 35.597,35.351 cw(c35.797,35.351) 35.997,35.351 35.997,35.165 ccw(c36.197,35.165) 36.397,35.165 36.397,35.351 cw(c36.597,35.351) 36.797,35.351 36.797,35.165 ccw(c36.997,35.165) 37.197,35.165 37.197,35.351 cw(c37.397,35.351) 37.597,35.351 37.597,35.165 ccw(c37.797,35.165) 37.997,35.165 37.997,35.351 cw(c38.197,35.351) 38.397,35.351 38.397,35.165 ccw(c38.597,35.165) 38.797,35.165 38.797,35.351 cw(c38.997,35.351) 39.197,35.351 39.197,35.168 ccw(c39.397,35.168) 39.397,34.968 39.643,34.968 39.659,34.967 cw(c39.643,34.824) 39.709,34.952 cw(c39.643,34.824) 39.744,34.926 41.101,33.569 41.14,33.53 ccw(c41.57,33.961) 41.57,33.352 41.887,33.352 cw(c41.887,32.989) 42.144,33.246 42.145,33.245 cw(c41.905,33.007) 42.243,33.007 42.243,32.865 ccw(c42.544,32.865) 42.331,32.652 42.39,32.593 42.391,32.592 cw(c41.983,32.185) 42.559,32.185 42.617,32.161 v1(42.62,32.16)
DQ_M10: D1.L2.G3 D1.L7.C8 | length 25.7
  Top Layer w0.1: D1.L7.C8@30.42,35.665 30.82,36.065 v1(30.82,36.865) ; v1(42.62,30.56) D1.L2.G3@43.02,30.16
  Middle Layer 3 w0.1: v1(30.82,36.865) 31.099,37.144 ; 31.099,37.144 cw(c31.355,36.889) 31.355,37.25 31.96,37.25 cw(c31.96,36.993) 32.142,37.175 33.147,36.17 33.314,36.003 ccw(c33.708,36.398) 33.708,35.84 34.483,35.84 34.533,35.84 ccw(c34.533,36.04) 34.733,36.04 34.733,36.14 cw(c34.933,36.14) 35.133,36.14 35.133,35.976 ccw(c35.333,35.976) 35.533,35.976 35.533,36.128 cw(c35.733,36.128) 35.933,36.128 35.933,35.976 ccw(c36.133,35.976) 36.333,35.976 36.333,36.128 cw(c36.533,36.128) 36.733,36.128 36.733,35.976 ccw(c36.933,35.976) 37.133,35.976 37.133,36.14 cw(c37.333,36.14) 37.533,36.14 37.533,35.976 ccw(c37.733,35.976) 37.933,35.976 37.933,36.14 cw(c38.133,36.14) 38.333,36.14 38.333,35.976 ccw(c38.533,35.976) 38.733,35.976 38.733,36.14 cw(c38.933,36.14) 39.133,36.14 39.133,35.959 ccw(c39.333,35.959) 39.533,35.959 39.533,36.14 cw(c39.733,36.14) 39.933,36.14 39.933,35.959 ccw(c40.133,35.959) 40.333,35.959 40.333,36.04 cw(c40.533,36.04) 40.733,36.04 ccw(c40.933,36.04) 40.933,35.84 41.49,35.84 41.773,35.84 cw(c41.773,35.366) 42.108,35.701 cw(c41.82,35.413) 42.228,35.413 42.228,33.699 ccw(c42.505,33.699) 42.309,33.503 42.381,33.43 ccw(c42.569,33.618) 42.569,33.352 42.658,33.352 cw(c42.658,33.018) 42.895,33.255 cw(c42.604,32.964) 43.015,32.964 43.015,31.264 cw(c42.269,31.264) 42.796,30.736 v1(42.62,30.56)
DQ_M11: D1.L2.H3 D1.L7.C2 | length 25.7
  Top Layer w0.1: D1.L7.C2@25.62,35.665 v1(26.02,36.065) ; v1(42.62,29.76) D1.L2.H3@43.02,29.36
  Middle Layer 3 w0.1: v1(26.02,36.065) 26.299,35.786 26.3,35.785 ccw(c26.553,36.037) 26.553,35.68 ; 26.554,35.68 32.216,35.68 cw(c32.217,35.401) 32.415,35.598 32.416,35.597 33.631,34.382 ccw(c33.926,34.677) 33.856,34.266 ccw(c33.926,34.677) 33.906,34.26 33.926,34.26 34.006,34.26 ccw(c34.006,34.46) 34.206,34.46 34.206,34.519 cw(c34.406,34.519) 34.606,34.519 34.606,34.405 ccw(c34.806,34.405) 35.006,34.405 35.006,34.519 cw(c35.206,34.519) 35.406,34.519 35.406,34.405 ccw(c35.606,34.405) 35.806,34.405 35.806,34.519 cw(c36.006,34.519) 36.206,34.519 36.206,34.405 ccw(c36.406,34.405) 36.606,34.405 36.606,34.519 cw(c36.806,34.519) 37.006,34.519 37.006,34.405 ccw(c37.206,34.405) 37.406,34.405 37.406,34.508 cw(c37.606,34.508) 37.806,34.508 37.806,34.405 ccw(c38.006,34.405) 38.206,34.405 38.206,34.46 cw(c38.406,34.46) 38.606,34.46 ccw(c38.806,34.46) 38.806,34.26 39.431,34.26 39.433,34.26 cw(c39.431,33.517) 39.483,34.258 cw(c39.431,33.517) 39.573,34.246 cw(c39.431,33.517) 39.958,34.042 cw(c39.457,33.544) 40.163,33.544 ; 40.163,33.543 40.163,33.352 ccw(c40.505,33.352) 40.263,33.111 40.569,32.805 ; 40.57,32.804 40.776,32.598 ccw(c40.925,32.748) 40.925,32.536 41.926,32.536 cw(c41.926,32.22) 42.15,32.444 cw(c41.963,32.257) 42.227,32.257 42.227,30.315 ccw(c42.618,30.315) 42.342,30.038 v1(42.62,29.76)
DQ_M12: D1.L2.J3 D1.L7.A7 | length 25.7
  Top Layer w0.1: v1(29.22,37.665) D1.L7.A7@29.62,37.265 ; v1(42.62,28.96) D1.L2.J3@43.02,28.56
  Middle Layer 3 w0.1: v1(29.22,37.665) 29.249,37.653 cw(c30.245,36.657) 30.245,38.065 31.718,38.065 cw(c31.718,37.517) 32.105,37.905 33.323,36.687 ccw(c33.602,36.967) 33.602,36.572 35.283,36.572 35.333,36.572 ccw(c35.333,36.772) 35.533,36.772 35.533,36.879 cw(c35.733,36.879) 35.933,36.879 35.933,36.755 ccw(c36.133,36.755) 36.333,36.755 36.333,36.865 cw(c36.533,36.865) 36.733,36.865 36.733,36.755 ccw(c36.933,36.755) 37.133,36.755 37.133,36.772 cw(c37.333,36.772) 37.533,36.772 ccw(c37.733,36.772) 37.733,36.572 38.7,36.572 41.812,36.572 ; 41.813,36.572 cw(c41.813,36.025) 42.199,36.412 42.2,36.411 42.866,35.745 cw(c42.468,35.348) 43.03,35.348 43.03,33.691 ccw(c43.349,33.691) 43.123,33.466 43.151,33.438 ccw(c43.35,33.637) 43.35,33.356 43.523,33.356 cw(c43.523,33.052) 43.737,33.267 cw(c43.502,33.032) 43.835,33.032 43.835,30.387 cw(c43.627,30.387) 43.774,30.24 cw(c43.563,30.451) 43.563,30.153 43.314,30.153 ccw(c43.314,29.883) 43.123,30.074 ccw(c43.349,29.848) 43.03,29.848 43.03,29.544 cw(c42.611,29.544) 42.907,29.247 v1(42.62,28.96)
DQ_M13: D1.L2.H2 D1.L7.A2 | length 25.7
  Top Layer w0.1: D1.L7.A2@25.62,37.265 v1(26.02,36.865) ; v1(41.82,29.76) D1.L2.H2@42.22,29.36
  Middle Layer 3 w0.1: v1(26.02,36.865) 25.783,36.628 ccw(c26.201,36.21) 25.61,36.21 25.61,36.065 ccw(c26.265,36.065) 25.802,35.602 26.365,35.038 ccw(c26.82,35.493) 26.82,34.85 27.002,34.85 cw(c27.002,34.491) 27.255,34.745 cw(c27.027,34.517) 27.35,34.517 27.35,33.938 ccw(c27.59,33.938) 27.59,33.699 ccw(c27.59,33.938) 27.829,33.938 27.829,34.56 cw(c28.069,34.56) 28.069,34.8 cw(c28.069,34.56) 28.308,34.56 28.308,33.938 ccw(c28.548,33.938) 28.548,33.699 ccw(c28.548,33.938) 28.788,33.937 cw(c29.145,33.937) 28.891,34.189 cw(c29.091,33.99) 29.091,34.272 cw(c29.091,33.95) 29.319,34.178 29.7,33.798 ccw(c30.161,34.26) 30.161,33.606 32.499,33.606 cw(c32.499,32.833) 33.046,33.38 35.299,31.127 ccw(c35.918,31.746) 35.662,30.909 ccw(c35.918,31.746) 35.712,30.895 35.918,30.87 37.373,30.87 ccw(c37.373,31.07) 37.573,31.07 37.573,31.1 cw(c37.773,31.1) 37.973,31.1 37.973,30.99 ccw(c38.173,30.99) 38.373,30.99 38.373,31.152 cw(c38.573,31.152) 38.773,31.152 38.773,30.99 ccw(c38.973,30.99) 39.173,30.99 39.173,31.152 cw(c39.373,31.152) 39.573,31.152 39.573,31.07 ccw(c39.773,31.07) 39.773,30.87 40.184,30.87 cw(c40.184,29.602) 40.223,30.87 cw(c40.184,29.602) 41.081,30.499 v1(41.82,29.76)
DQ_M14: D1.L2.H1 D1.L7.B8 | length 25.8
  Top Layer w0.1: v1(30.02,36.865) D1.L7.B8@30.42,36.465 ; v1(41.02,29.76) D1.L2.H1@41.42,29.36
  Middle Layer 3 w0.1: 25.323,35.573 ccw(c26.015,35.573) 25.526,35.084 25.527,35.083 27.185,33.425 ; 25.323,35.574 25.323,36.884 ; 25.323,36.885 cw(c25.678,36.885) 25.428,37.135 25.429,37.137 cw(c25.704,36.859) 25.704,37.25 29.278,37.25 ; 27.185,33.425 ccw(c27.567,33.806) 27.567,33.267 ; 27.568,33.267 32.405,33.267 ; 29.279,37.25 cw(c29.279,36.392) 29.886,36.999 29.887,36.998 v1(30.02,36.865) ; 32.406,33.267 cw(c32.406,32.58) 32.891,33.066 32.892,33.065 35.224,30.733 ccw(c35.718,31.227) 35.718,30.528 40.183,30.528 cw(c40.183,29.572) 40.86,30.247 cw(c40.467,29.858) 41.02,29.858 v1(41.02,29.76)
DQ_M15: D1.L2.J1 D1.L7.A3 | length 25.7
  Top Layer w0.1: v1(25.24,37.665) 26.02,37.665 D1.L7.A3@26.42,37.265 ; v1(41.02,28.96) D1.L2.J1@41.42,28.56
  Middle Layer 3 w0.1: v1(25.24,37.665) 25.24,37.659 25.236,37.655 ccw(c25.714,37.176) 25.037,37.176 25.037,35.461 ccw(c25.831,35.461) 25.27,34.9 27.475,32.695 ; 27.476,32.694 ccw(c27.992,33.21) 27.992,32.48 ; 27.993,32.48 32.717,32.48 cw(c32.717,32.015) 33.046,32.344 35.106,30.284 ; 35.107,30.283 ccw(c35.405,30.581) 35.405,30.16 ; 35.406,30.16 35.81,30.16 cw(c35.81,29.797) 36.066,30.054 36.992,29.128 ccw(c37.397,29.532) 37.397,28.96 38.874,28.96 38.924,28.96 ccw(c38.924,29.16) 39.124,29.16 39.124,29.642 cw(c39.324,29.642) 39.524,29.642 39.524,29.051 ccw(c39.724,29.051) 39.924,29.051 39.924,29.515 cw(c40.124,29.515) 40.324,29.515 40.324,29.16 ccw(c40.524,29.16) 40.524,28.96 40.897,28.96 v1(41.02,28.96)
ETH_COL_B501: D1.L2.C12 X7.L1.13 | length 39.3
  Top Layer w0.1: D1.L2.C12@50.22,33.36 v1(50.62,33.76)
  Middle Layer 4 w0.1: X7.L1.13@46.965,63.2 47.518,62.647 cw(c46.451,61.58) 47.959,61.631 ; 47.96,61.63 47.96,61.2 ccw(c49.108,61.2) 48.296,60.388 48.866,59.819 ccw(c50.662,61.615) 50.662,59.075 51.221,59.075 cw(c51.221,58.218) 51.828,58.824 54.137,56.514 54.138,56.513 cw(c52.2,54.576) 54.94,54.576 54.94,48.53 cw(c54.292,48.53) 54.751,48.072 52.712,46.033 52.528,45.849 cw(c52.387,45.991) 52.245,45.849 52.081,46.013 ccw(c51.94,45.872) 51.798,46.013 ccw(c51.94,45.872) 51.798,45.73 52.036,45.493 cw(c51.894,45.352) 52.036,45.21 cw(c51.894,45.352) 51.753,45.21 51.472,45.491 ccw(c51.33,45.35) 51.189,45.491 ccw(c51.33,45.35) 51.189,45.208 51.397,45.001 cw(c51.255,44.859) 51.397,44.718 50.796,44.117 49.758,43.079 ccw(c50.535,42.302) 49.436,42.302 49.436,34.487 ccw(c49.757,34.487) 49.53,34.26 ccw(c49.796,34.526) 49.796,34.15 50.17,34.15 cw(c50.17,34.005) 50.272,34.108 v1(50.62,33.76)
ETH_CRS_B501: D1.L2.B12 X7.L1.12 | length 39.6
  Top Layer w0.1: D1.L2.B12@50.22,34.16 v1(50.62,34.56)
  Middle Layer 4 w0.1: X7.L1.12@48.965,60.925 X7.L1.12@48.965,61.2 ccw(c49.725,61.2) 49.188,60.662 49.9,59.95 ccw(c51.005,61.055) 51.005,59.492 51.372,59.492 cw(c51.372,58.566) 52.027,59.221 54.463,56.785 cw(c52.322,54.641) 55.352,54.641 55.352,48.506 cw(c54.386,48.506) 55.069,47.823 50.414,43.168 ccw(c50.889,42.691) 50.216,42.691 ; 50.216,42.69 50.216,42.58 50.216,42.13 cw(c50.016,42.13) 50.016,41.93 49.974,41.93 ccw(c49.974,41.73) 49.974,41.53 50.376,41.53 cw(c50.376,41.33) 50.376,41.13 49.974,41.13 ccw(c49.974,40.93) 49.974,40.73 50.376,40.73 cw(c50.376,40.53) 50.376,40.33 49.974,40.33 ccw(c49.974,40.13) 49.974,39.93 50.376,39.93 cw(c50.376,39.73) 50.376,39.53 49.974,39.53 ccw(c49.974,39.33) 49.974,39.13 50.376,39.13 cw(c50.376,38.93) 50.376,38.73 49.974,38.73 ccw(c49.974,38.53) 49.974,38.33 50.333,38.33 cw(c50.333,38.13) 50.333,37.93 50.016,37.93 ccw(c50.016,37.73) 50.016,37.53 cw(c50.016,37.33) 50.216,37.33 50.216,36.617 50.216,35.18 ccw(c50.737,35.18) 50.368,34.812 v1(50.62,34.56)
ETH_INT_B501: D1.L2.B9 X7.L1.18 | length 39.2
  Top Layer w0.2: v1(47.42,34.56) D1.L2.B9@47.82,34.16
  Middle Layer 4 w0.1: X7.L1.18@42.98,61.135 47.323,56.793 cw(c45.727,55.197) 47.983,55.197 47.983,51.861 cw(c46.322,51.861) 47.497,50.687 46.708,49.898 ccw(c47.854,48.752) 46.233,48.752 46.233,43.83 46.233,43.78 ccw(c46.433,43.78) 46.433,43.58 46.648,43.58 cw(c46.648,43.38) 46.648,43.18 46.168,43.18 ccw(c46.168,42.98) 46.168,42.78 46.648,42.78 cw(c46.648,42.58) 46.648,42.38 46.168,42.38 ccw(c46.168,42.18) 46.168,41.98 46.648,41.98 cw(c46.648,41.78) 46.648,41.58 46.168,41.58 ccw(c46.168,41.38) 46.168,41.18 46.648,41.18 cw(c46.648,40.98) 46.648,40.78 46.168,40.78 ccw(c46.168,40.58) 46.168,40.38 46.648,40.38 cw(c46.648,40.18) 46.648,39.98 46.168,39.98 ccw(c46.168,39.78) 46.168,39.58 46.586,39.58 cw(c46.586,39.38) 46.586,39.18 46.233,39.18 ccw(c46.233,38.98) 46.233,38.78 46.433,38.78 cw(c46.433,38.58) 46.433,38.38 ccw(c46.433,38.18) 46.233,38.18 46.233,37.513 46.233,35.24 ccw(c46.496,35.24) 46.309,35.055 ccw(c46.528,35.272) 46.528,34.964 ; 46.529,34.964 46.754,34.964 cw(c46.754,34.404) 47.15,34.8 47.369,34.581 ccw(c47.42,34.632) v1(47.42,34.56)
ETH_MDC_B501: D1.L2.C10 X7.L1.17 | length 39.5
  Top Layer w0.2: v1(48.22,33.76) D1.L2.C10@48.62,33.36
  Middle Layer 3 w0.1: X7.L1.17@42.965,63.2 43.801,62.364 ccw(c44.39,62.953) 44.39,62.12 44.924,62.12 ; 44.925,62.12 cw(c44.925,61.197) 45.579,61.848 cw(c44.967,61.24) 45.83,61.24 45.83,59.912 ccw(c48.37,59.912) 46.574,58.116 46.982,57.708 ccw(c48.778,59.504) 48.778,56.964 50.364,56.964 cw(c50.364,55.414) 51.46,56.51 cw(c50.567,55.617) 51.83,55.617 51.83,52.055 51.83,51.04 cw(c51.63,51.04) 51.63,50.84 51.592,50.84 ccw(c51.592,50.64) 51.592,50.44 51.643,50.44 cw(c51.643,50.24) 51.643,50.04 51.53,50.04 ccw(c51.53,49.84) 51.53,49.64 51.643,49.64 cw(c51.643,49.44) 51.643,49.24 51.53,49.24 ccw(c51.53,49.04) 51.53,48.84 51.63,48.84 cw(c51.63,48.64) 51.83,48.64 51.83,48.59 v1@51.83,48.11
  Middle Layer 4 w0.1: X7.L1.17@42.965,63.2 X7.L1.17@43.226,62.939 ; v1(48.22,33.76) 48.527,34.067 ccw(c48.272,34.323) 48.633,34.323 48.633,43.934 48.633,43.963 cw(c49.817,43.963) 48.98,44.8 51.54,47.36 ccw(c50.84,48.06) v1(51.83,48.06)
ETH_MDIO_B501: D1.L2.C11 X7.L1.15 | length 39.2
  Top Layer w0.1: D1.L2.C11@49.42,33.36 v1(49.82,33.76)
  Middle Layer 3 w0.1: X7.L1.15@44.965,63.2 45.736,62.429 cw(c44.857,61.55) 46.1,61.55 46.1,59.983 ccw(c48.353,59.983) 46.76,58.39 47.248,57.902 47.249,57.901 ccw(c48.723,59.375) 48.724,57.29 ; 48.725,57.29 50.345,57.29 cw(c50.345,55.515) 51.6,56.77 51.652,56.718 cw(c50.474,55.54) 52.14,55.54 ; 52.14,55.539 52.14,48.513 ccw(c52.413,48.513) 52.22,48.32 cw(c52.074,48.174) 52.281,48.174 v1(52.281,47.681)
  Middle Layer 4 w0.1: v1(49.82,33.76) 50.056,33.524 cw(c49.658,33.125) 50.221,33.125 50.221,32.845 cw(c49.921,32.845) 50.134,32.633 cw(c49.936,32.831) 49.936,32.551 49.789,32.551 cw(c49.789,32.935) 49.518,32.664 49.044,33.137 cw(c49.393,33.486) 48.9,33.486 48.9,43.89 cw(c49.914,43.89) 49.197,44.607 v1@52.276,47.686